# Altium PCB PCB.PcbDoc (part 2 of 2)
Units mil, origin at the board's own origin, x right, y up, seen from the top; angles counter-clockwise.
Board outline 9739 x 8533 mil, 4 copper layers (TopLayer, GND, VCC, BottomLayer); 78 components, 50 nets, 272 pads, 89 vias.
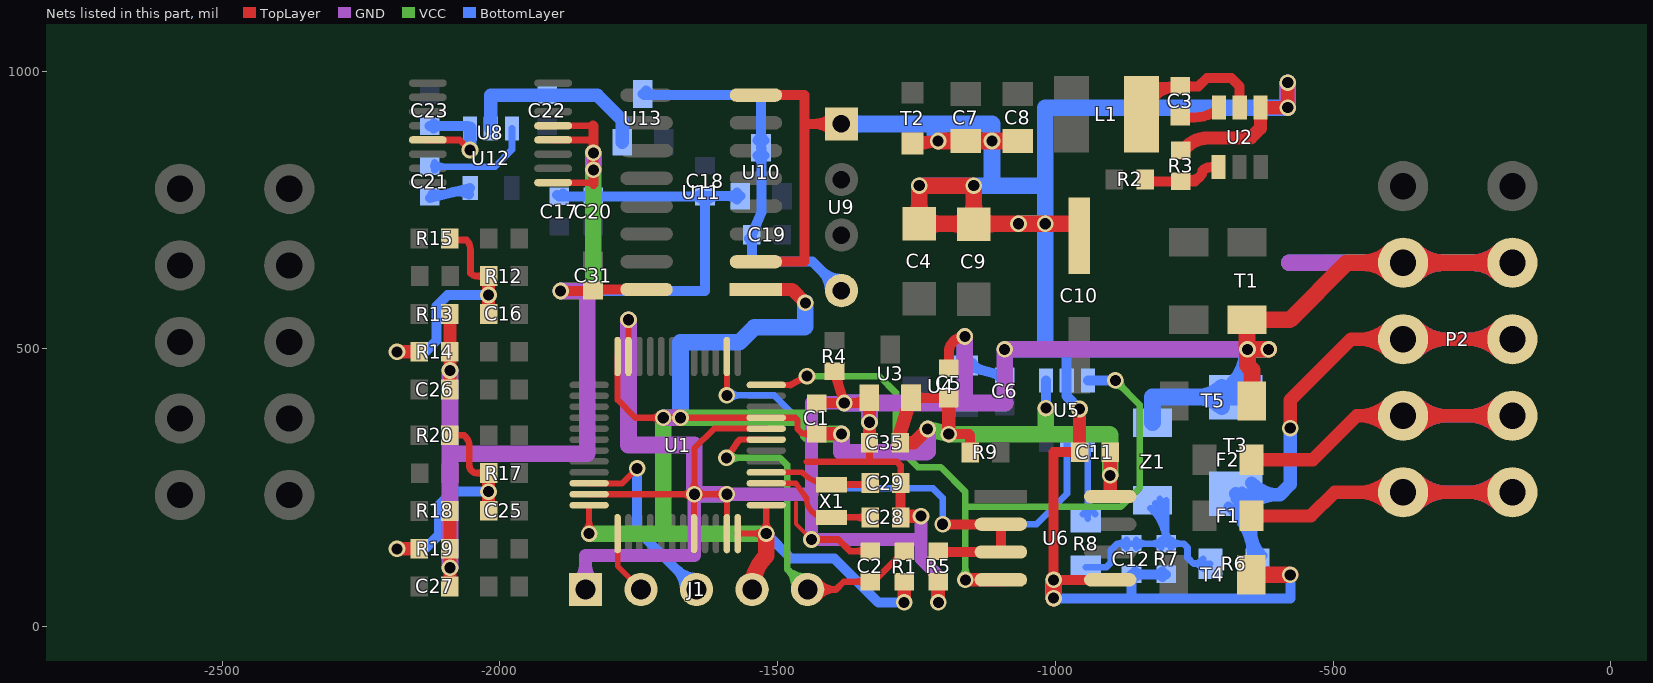
[diagram p4: the nets of this part, all layers, seen from the top]

## Via types
v1: diameter 30, hole 20, TopLayer to BottomLayer, 87 vias
v2: diameter 24, hole 12, TopLayer to BottomLayer, 2 vias

## Nets (pads, with @x,y where several pads share a name; then routed paths per layer and width w, separated by ;. In a path a pad name is that pad's centre, name@x,y a point inside that pad or via, vN(x,y) a via of type N, cw(c..) or ccw(c..) an arc to the next point about the centre after c; other vN are vias at no path point) (continued)
CPU_TXD: U1.12 U5.3 U6.4 | length 1451.7
  TopLayer w11: U1.12@-1520.51,435.14 -1476.96,435.14
  TopLayer w12: -1476.96,435.14 v1(-1446.96,450.87)
  TopLayer w24: v1(-1161.96,84.27) U6.4@-1097.96,84.27
  VCC w12: v1(-1446.96,450.87) -1316.96,450.87 -1286.96,420.87 -1286.96,326.68 -1247.16,286.87 -1206.16,286.87 -1161.96,242.68 -1161.96,215.87 ; v1(-1161.96,84.27) -1161.96,215.87 ; v1(-891.96,443.27) -847.96,399.27 -847.96,249.87 -881.96,215.87 -1161.96,215.87 ; -1161.96,106 cw(c-1183.69,106) -1168.32,90.64 ccw(c-1183.69,106) -1161.96,106 ; -1161.96,106 ccw(c-1140.23,106) -1155.6,90.64 cw(c-1140.23,106) -1161.96,106 ; -876.6,427.91 cw(c-861.23,443.27) -882.96,443.27 ccw(c-861.23,443.27) -876.6,427.91 ; -876.6,427.91 ccw(c-891.96,412.55) -891.96,434.27 cw(c-891.96,412.55) -876.6,427.91
  BottomLayer w18: U5.3@-941.16,443.27 v1(-891.96,443.27)
CPU_TXDEN: R5.2 U1.14 U5.5 U6.2 U6.3 | length 1412.1
  TopLayer w11: v1(-1591.38,416.46) U1.14@-1591.38,486.32
  TopLayer w18: R5.2@-1210.67,134.27 U6.3@-1097.96,134.27 U6.2@-1097.96,184.27 v1(-1202.96,184.27) ; R5.2@-1203.93,140.66 ccw(c-1188.5,156.09) -1188.5,134.27 cw(c-1188.5,156.09) R5.2@-1203.93,140.66
  BottomLayer w12: v1(-1591.38,416.46) -1506.54,416.46 -1444.96,354.87 -1444.96,273.87 -1419.96,248.87 -1219.96,248.87 -1202.96,231.87 v1(-1202.96,184.27) -1033.96,184.27 -978.96,239.27 U5.5@-978.96,336.27 ; -1569.65,416.46 cw(c-1569.65,438.18) -1585.01,422.82 ccw(c-1569.65,438.18) -1569.65,416.46 ; -1569.65,416.46 ccw(c-1569.65,394.73) -1585.01,410.09 cw(c-1569.65,394.73) -1569.65,416.46 ; -1181.23,184.27 cw(c-1181.23,206) -1196.6,190.64 ccw(c-1181.23,206) -1181.23,184.27 ; -1181.23,184.27 ccw(c-1181.23,162.55) -1196.6,177.91 cw(c-1181.23,162.55) -1181.23,184.27
DVDD: C1.1 C5.1 C11.2 C35.1 J1.4 R1.2 R9.2 U1.1 U1.9 U1.24 U1.36 U1.48 U3.2 U5.1 U6.8 U11.1 | length 4234.6
  TopLayer w11: v1(-1839.41,167.42) U1.36@-1839.41,218.6 ; U1.24@-1788.23,486.32 -1788.23,408.14 -1756.17,376.09 U1.9@-1520.51,376.09 -1468.17,376.09 -1463.96,371.87 -1463.96,355.75 -1455.58,347.38 ; U1.48@-1571.69,167.42 v1(-1520.51,167.42) ; v1@-1520.51,169.97 U1.1@-1520.51,218.6 ; C1.1@-1429.67,347.38 -1455.58,347.38 ; -1839.41,190.36 cw(c-1862.34,190.36) -1846.13,174.14 ccw(c-1862.34,190.36) -1839.41,190.36 ; -1839.41,190.36 ccw(c-1816.47,190.36) -1832.69,174.14 cw(c-1816.47,190.36) -1839.41,190.36 ; -1728.89,376.08 cw(c-1728.89,353.15) -1712.68,369.37 ccw(c-1728.89,353.15) -1728.89,376.08 ; -1728.89,376.09 ccw(c-1728.89,399.02) -1712.68,382.8 cw(c-1728.89,399.02) -1728.89,376.09 ; -1543.45,167.42 cw(c-1543.45,144.49) -1527.23,160.71 ccw(c-1543.45,144.49) -1543.45,167.42 ; -1543.45,167.42 ccw(c-1543.45,190.36) v1@-1527.23,174.14 ; -1543.45,167.42 ccw(c-1543.45,190.36) v1@-1527.23,174.14 ; v1@-1527.23,174.14 ccw(c-1543.45,190.36) -1520.51,190.36 ; v1@-1527.23,174.14 ccw(c-1543.45,190.36) -1520.51,190.36 ; -1520.51,190.36 ccw(c-1497.58,190.36) -1513.79,174.14 cw(c-1497.58,190.36) -1520.51,190.36 ; -1455.58,347.38 cw(c-1455.58,324.53) -1439.06,340.3 ccw(c-1455.58,324.53) -1455.58,347.38 ; -1455.58,347.38 ccw(c-1455.58,370.22) -1439.06,354.45 cw(c-1455.58,370.22) -1455.58,347.38
  TopLayer w18: U3.2@-1259.96,411.87 C5.1@-1198.77,411.87 ; v1(-1191.96,346.56) -1154.96,346.56 -1153.58,345.18 R9.2@-1153.58,313.56 ; U6.8@-901.34,234.51 U6.8@-901.11,234.27 ; -1238.92,411.87 cw(c-1238.92,432.92) -1253.8,418.04 ccw(c-1238.92,432.92) -1238.92,411.87 ; -1238.92,411.87 ccw(c-1238.92,390.83) -1253.8,405.71 cw(c-1238.92,390.83) -1238.92,411.87 ; -1153.58,331.82 cw(c-1169.86,331.82) -1158.35,320.3 ccw(c-1169.86,331.82) -1153.58,331.82 ; -1153.58,331.83 ccw(c-1137.28,331.83) -1148.8,320.3 cw(c-1137.28,331.83) -1153.58,331.83 ; -1213.59,411.87 cw(c-1213.59,390.41) -1198.41,405.59 ccw(c-1213.59,390.41) -1213.59,411.87
  TopLayer w24: U11.1@-1539,607 -1474,607 v1(-1450,583) ; C1.1@-1429.67,347.38 v1@-1385.46,347.38 ; C35.1@-1279.46,331.16 -1254.67,331.16 v1(-1229.96,355.87) ; C35.1@-1279.46,348.16 U3.2@-1259.96,411.87 ; v1(-1272.25,43.56) R1.2@-1272.25,80.66 ; v1(-1191.96,346.56) C5.1@-1191.96,410.85 ; U6.8@-901.34,234.51 C11.2@-901.34,313.98 ; U3.2@-1266.87,389.29 cw(c-1248.03,383.52) -1257.28,400.92 ccw(c-1248.03,383.52) U3.2@-1266.87,389.29
  TopLayer w30: J1.4@-1545.96,66.87 cw(c-1461.46,66.87) -1521.21,126.62 -1520.51,127.32 v1(-1520.51,167.42)
  GND w30: v1(-1705.96,376.09) v1(-1674.96,376.09) ; v1(-1384.96,346.87) -1384.96,313.87 -1231.27,313.87 -1229.96,315.18 v1(-1229.96,355.87)
  VCC w24: -902.25,346.56 -901.34,345.66
  VCC w30: v1(-1839.41,167.42) v1(-1520.51,167.42) ; -1705.96,168.42 v1(-1705.96,376.09) v1(-1674.96,376.09) -1445.96,376.09 -1445.96,347.38 -1445.96,346.87 v1(-1384.96,346.87) ; v1(-1229.96,355.87) v1(-1191.96,346.56) -902.25,346.56 ; -1016.96,351.56 v1(-1016.96,393.27) ; v1(-901.34,272.27) -901.34,345.66
  BottomLayer w18: v1(-1520.51,167.42) -1475.96,122.87 -1397.96,122.87 -1318.65,43.56 v1(-1272.25,43.56) ; v1(-1016.96,393.27) U5.1@-1016.96,443.27
  BottomLayer w30: v1(-1705.96,376.09) v1(-1674.96,376.09) -1674.96,512 -1569,512 -1542,539 -1451,539 -1450,540 v1(-1450,583)
GNDX: C1.2 C2.2 C4.2 C5.2 C6.2 C7.2 C8.2 C9.2 C10.2 C11.1 C12.2 C28.1 C29.1 C35.2 J1.1 P2.2 R3.1 R4.1 R5.1 R7.1 T1.2 T2.2 T3.2 T4.2 T5.2 U1.8 U1.23 U1.35 U1.44 U1.47 U2.4 U3.1 U4.1 U5.2 U6.5 U9.1 U11.2 U11.8 Z1.1 | length 15631
  TopLayer w8: -1466.96,222.87 -1466.96,184.87 v1(-1438.96,156.87)
  TopLayer w11: U1.35@-1839.41,238.29 -1591.79,238.29 v1@-1591.38,237.87 ; U1.23@-1768.54,486.32 v1(-1768.54,552.46) ; U1.44@-1650.43,167.42 v1@-1650.43,238.29 ; v1(-1649.96,238.29) -1649.96,320.87 -1614.43,356.4 U1.8@-1520.51,356.4 ; U1.47@-1591.38,167.42 v1(-1591.38,238.29) ; -1672.89,238.29 cw(c-1672.89,215.35) -1656.68,231.57 ccw(c-1672.89,215.35) -1672.89,238.29 ; -1672.89,238.29 ccw(c-1672.89,261.22) v1@-1656.68,245.01 ; -1672.89,238.29 ccw(c-1672.89,261.22) v1@-1656.68,245.01 ; v1@-1656.68,245.01 ccw(c-1672.89,261.22) -1649.96,261.22 ; v1@-1656.68,245.01 ccw(c-1672.89,261.22) -1649.96,261.22 ; -1649.96,261.22 ccw(c-1627.02,261.22) v1@-1643.24,245.01 ; -1649.96,261.22 ccw(c-1627.02,261.22) v1@-1643.24,245.01 ; v1@-1643.24,245.01 ccw(c-1627.02,261.22) -1627.02,238.29 ; v1@-1643.24,245.01 ccw(c-1627.02,261.22) -1627.02,238.29 ; -1627.02,238.29 ccw(c-1627.02,215.35) -1643.24,231.57 cw(c-1627.02,215.35) -1627.02,238.29 ; -1614.31,238.29 cw(c-1614.31,215.35) -1598.09,231.57 ccw(c-1614.31,215.35) -1614.31,238.29 ; -1614.31,238.29 ccw(c-1614.31,261.22) -1598.09,245.01 cw(c-1614.31,261.22) -1614.31,238.29
  TopLayer w12: -1446.96,296.87 -1284.96,296.87 -1278.46,290.38 C29.1@-1278.46,258.56 ; v1(-1438.96,156.87) -1390.96,156.87 -1369.98,135.9 C2.2@-1333.09,135.9 ccw(c-1333.09,136.99) C2.2@-1332,136.99 ; -1334.58,297.26 C35.2@-1334.58,331.16 ; -1358.59,135.9 cw(c-1358.59,112.36) -1341.95,129 ccw(c-1358.59,112.36) -1358.59,135.9 ; -1358.59,135.9 ccw(c-1358.59,159.43) -1341.95,142.79 cw(c-1358.59,159.43) -1358.59,135.9
  TopLayer w18: U11.2@-1539,657 -1452,657 -1452,957 U11.8@-1539,957 ; -1452,905 U9.1@-1385,905 ; C1.2@-1429.67,402.49 U3.1@-1334.58,402.49 ; R4.1@-1397.67,459.38 v1(-1379.96,402.49) ; C28.1@-1278.46,190.52 C28.1@-1278.46,196.56 -1278.46,228.87 C29.1@-1278.46,258.56 ; C5.2@-1191.67,465.47 -1191.67,493.56 ; C11.1@-956.46,313.98 -1003.25,313.98 -1003.25,85.56 -1001.96,84.27 -977.96,84.27 U6.5@-901.11,84.27 ; -1435.7,905 cw(c-1435.7,854.3) -1399.85,890.15 ccw(c-1435.7,854.3) -1435.7,905 ; -1435.7,905 ccw(c-1435.7,955.7) -1399.85,919.85 cw(c-1435.7,955.7) -1435.7,905 ; -1411.41,402.49 cw(c-1411.41,418.78) -1422.93,407.26 ccw(c-1411.41,418.78) -1411.41,402.49 ; -1411.41,402.49 ccw(c-1411.41,386.2) -1422.93,397.72 cw(c-1411.41,386.2) -1411.41,402.49 ; -1278.46,214.83 cw(c-1294.76,214.83) -1283.24,203.3 ccw(c-1294.76,214.83) -1278.46,214.83 ; -1278.46,214.82 ccw(c-1262.18,214.82) -1273.69,203.3 cw(c-1262.18,214.82) -1278.46,214.82 ; -1191.67,481.76 cw(c-1207.96,481.76) -1196.44,470.24 ccw(c-1207.96,481.76) -1191.67,481.76 ; -1191.67,481.76 ccw(c-1175.38,481.76) -1186.9,470.24 cw(c-1175.38,481.76) -1191.67,481.76 ; -1191.67,493.56 cw(c-1162.96,493.56) v1(-1162.96,522.27) ; -1191.67,493.56 cw(c-1162.96,493.56) v1(-1162.96,522.27) ; -1191.67,493.56 cw(c-1162.96,493.56) v1(-1162.96,522.27) ; -972.75,313.98 cw(c-972.75,297.69) -961.23,309.21 ccw(c-972.75,297.69) -972.75,313.98 ; -972.75,313.98 ccw(c-972.75,330.28) -961.23,318.76 cw(c-972.75,330.28) -972.75,313.98 ; -1391.31,438.94 cw(c-1369.63,445.68) -1389.73,456.24 ccw(c-1369.63,445.68) -1391.31,438.94 ; -1364.4,402.49 ccw(c-1364.4,435.41) -1341.12,412.13 cw(c-1364.4,435.41) -1364.4,402.49 ; C29.1@-1283.24,251.82 cw(c-1294.76,240.3) -1278.46,240.3 ccw(c-1294.76,240.3) C29.1@-1283.24,251.82 ; -1278.46,240.31 cw(c-1262.18,240.31) -1273.69,251.82 ccw(c-1262.18,240.31) -1278.46,240.31 ; -1003.25,99.46 ccw(c-987.77,99.46) -998.72,88.52 cw(c-987.77,99.46) -1003.25,99.46
  TopLayer w24: C35.2@-1334.58,334.16 U3.1@-1334.58,411.49 ; C28.1@-1278.46,198.87 v1(-1241.96,198.87) ; T2.2@-1257,868.76 v1(-1210.96,874.23) ; v1(-1210.67,43.56) R5.1@-1210.67,80.78 ; C11.1@-956.46,313.98 v1(-956.46,391.78) ; R3.1@-774.25,853.37 -763.86,863.76 cw(c-724.96,824.86) -724.96,879.87 -647.91,879.87 -630.69,897.09 U2.4@-630.69,934.49 ; U2.4@-630.96,934.49 U2.4@-630.69,934.49 ; v1(-581.51,979.49) v1(-581.51,934.49) ; v1@-581,935 v1(-581.51,934.49) ; U2.4@-630.69,934.49 v1(-581.51,934.49) ; T2.2@-1252.24,875.8 ccw(c-1238.66,893.04) -1236.08,871.25 cw(c-1238.66,893.04) T2.2@-1252.24,875.8
  TopLayer w30: v1(-1245,794) v1@-1244.96,793.96 ; v1(-1210.96,874.23) C7.2@-1160.96,874.23 C8.2@-1067.96,874.23 ; C9.2@-1146.96,724.27 v1(-1146.96,794.04) -1147.04,793.96 v1@-1244.96,793.96 ; v1(-1002.96,51.27) v1(-1002.96,84.27) ; C10.2@-959.96,725.27 C4.2@-1244.96,725.27 v1@-1244.96,793.96 ; v1@-654.96,500.27 T1.2@-654.96,552.27 -577.73,552.27 -474.8,655.2 P2.2@-177,655.2 ; T4.2@-646.96,93.27 v1(-576.96,93.27) ; T5.2@-645.96,406.27 -645.96,462.27 -653.96,470.27 v1(-653.96,499.27) v1(-615.96,499.27) ; -1244.96,761.49 cw(c-1281.17,761.49) -1255.57,735.88 ccw(c-1281.17,761.49) -1244.96,761.49 ; -1244.96,761.49 ccw(c-1208.75,761.49) C4.2@-1234.35,735.88 ; -1244.96,761.49 ccw(c-1208.75,761.49) C4.2@-1234.35,735.88 ; C4.2@-1234.35,735.88 ccw(c-1208.75,761.49) -1208.75,725.27 ; C4.2@-1234.35,735.88 ccw(c-1208.75,761.49) -1208.75,725.27 ; -1208.75,725.27 ccw(c-1208.75,689.06) -1234.35,714.67 cw(c-1208.75,689.06) -1208.75,725.27 ; C9.2@-1157.57,734.88 cw(c-1180.76,758.07) -1180.76,725.27 ccw(c-1180.76,758.07) C9.2@-1157.57,734.88 ; C9.2@-1157.57,734.88 ccw(c-1183.17,760.49) -1146.96,760.49 ; C9.2@-1157.57,734.88 ccw(c-1183.17,760.49) -1146.96,760.49 ; -1146.96,760.49 ccw(c-1110.75,760.49) C9.2@-1136.35,734.88 ; -1146.96,760.49 ccw(c-1110.75,760.49) C9.2@-1136.35,734.88 ; C9.2@-1136.35,734.88 ccw(c-1113.16,758.07) -1113.16,725.27 cw(c-1113.16,758.07) C9.2@-1136.35,734.88 ; -446.94,655.2 cw(c-446.94,582.11) -395.26,633.8 ccw(c-446.94,582.11) -446.94,655.2 ; -446.94,655.2 ccw(c-446.94,728.3) -395.26,676.61 cw(c-446.94,728.3) -446.94,655.2 ; -300.76,655.2 cw(c-300.76,728.3) -352.44,676.61 ccw(c-300.76,728.3) -300.76,655.2 ; -300.76,655.2 ccw(c-300.76,582.11) -352.44,633.8 cw(c-300.76,582.11) -300.76,655.2 ; -250.09,655.2 cw(c-250.09,582.11) -198.41,633.8 ccw(c-250.09,582.11) -250.09,655.2 ; -250.09,655.2 ccw(c-250.09,728.3) -198.41,676.61 cw(c-250.09,728.3) -250.09,655.2 ; -1185.59,725.27 cw(c-1185.59,685.65) -1157.57,713.67 ccw(c-1185.59,685.65) -1185.59,725.27 ; C9.2@-1136.35,713.67 cw(c-1108.33,685.65) -1108.33,725.27 ccw(c-1108.33,685.65) C9.2@-1136.35,713.67
  GND w24: J1.1@-1845.96,66.87 -1845.96,127.96 -1846,128 -1650,128 -1649.96,128.04 v1(-1649.96,238.29) ; v1(-1591.38,238.29) -1438.38,238.29 ; v1(-1379.96,402.49) -1380.47,403 -1439,403 -1438.96,402.96 v1(-1438.96,156.87) -1241.96,156.87 ; v1(-1241.96,198.87) -1241.96,122.87 -1210.67,91.58 v1(-1210.67,43.56) ; -1845.96,110.33 cw(c-1889.42,110.33) -1858.69,79.6 ccw(c-1889.42,110.33) -1845.96,110.33 ; -1845.96,110.33 ccw(c-1802.5,110.33) -1833.23,79.6 cw(c-1802.5,110.33) -1845.96,110.33
  GND w30: J1.1@-1846.96,67.87 J1.1@-1845.96,66.87 ; v1(-1768.54,552.46) -1768.54,327.46 -1768.35,327 -1650.09,327 -1649.96,326.87 v1(-1649.96,238.29) v1(-1591.38,238.29) ; v1(-1379.96,402.49) -1090.58,402.49 ; v1(-1334.58,367.87) -1333.96,368.49 -1333.96,402.49 ; -1162.96,407.49 v1(-1162.96,522.27) ; -1091.25,403.16 v1(-1091.25,499.27) v1(-615.96,499.27) ; v1(-1066.16,725.27) v1(-1018.16,725.27) ; v1(-1002.96,51.27) v1(-1002.96,84.27) ; v1(-581.51,934.49) v1(-581.51,979.49) ; -578.52,655.2 P2.2@-177,655.2
  VCC w30: v1(-1649.96,238.29) v1(-1591.38,238.29) ; v1(-1066.16,725.27) v1(-1018.16,725.27) ; v1(-1002.96,51.27) v1(-1002.96,84.27) ; v1(-653.96,499.27) v1(-615.96,499.27) ; v1(-581.51,934.49) v1(-581.51,979.49) ; -515,655.2 P2.2@-177,655.2
  BottomLayer w18: U4.1@-1162.96,470.27 C6.2@-1091.25,450.89 ; v1(-1002.96,84.27) v1(-1002.96,51.27) -1001.96,50.27 -873.96,50.27 ; -979.67,499.27 -979.67,443.39 U5.2@-979.56,443.27 -979.56,414.88 v1(-956.46,391.78) ; R7.1@-800.66,94.16 C12.2@-862.96,94.16 -862.96,50.27 -873.96,50.27 ; v1(-576.96,93.27) -576.36,92.68 -576.36,50.27 -873.96,50.27 ; -862.96,77.87 cw(c-846.67,77.87) -858.19,89.39 ccw(c-846.67,77.87) -862.96,77.87 ; -862.96,77.87 ccw(c-879.25,77.87) -867.73,89.39 cw(c-879.25,77.87) -862.96,77.87 ; -844.7,94.16 cw(c-844.7,110.45) -856.22,98.93 ccw(c-844.7,110.45) -844.7,94.16 ; -844.7,94.16 ccw(c-844.7,77.87) -856.22,89.39 cw(c-844.7,77.87) -844.7,94.16 ; U4.1@-1149.5,474.62 ccw(c-1126.69,487.72) -1133.55,462.32 cw(c-1126.69,487.72) U4.1@-1149.5,474.62 ; -1110.01,455.96 cw(c-1114.72,438.54) -1099.07,447.53 ccw(c-1114.72,438.54) -1110.01,455.96 ; v1@-998.72,55.52 ccw(c-986.06,68.17) -986.06,50.27 cw(c-986.06,68.17) v1@-998.72,55.52 ; -819.09,94.16 ccw(c-819.09,110.86) -807.28,99.05 cw(c-819.09,110.86) -819.09,94.16 ; -818.51,94.16 cw(c-818.51,78.28) -807.28,89.51 ccw(c-818.51,78.28) -818.51,94.16 ; v1@-581.2,89.03 cw(c-592.89,77.34) -576.36,77.34 ccw(c-592.89,77.34) v1@-581.2,89.03
  BottomLayer w24: C6.2@-1091.25,450.89 v1(-1091.25,499.27)
  BottomLayer w30: v1(-1649.96,238.29) v1(-1591.38,238.29) ; U9.1@-1385,905 -1114,905 -1113.96,904.96 v1(-1113.96,874.23) -1113.96,795.04 -1115,794 ; v1(-1379.96,402.49) -1335.19,402.49 -1334.58,401.87 v1(-1334.58,367.87) ; v1(-1245,794) -1019,794 -1018.16,793.16 -1018.16,774 ; U4.1@-1162.96,470.27 v1(-1162.96,522.27) ; v1(-1091.25,499.27) v1(-615.96,499.27) ; v1(-1066.16,725.27) v1(-1018.16,725.27) ; -1018.16,501.27 v1(-1018.16,725.27) ; v1(-1002.96,51.27) v1(-1002.96,84.27) ; Z1.1@-824.96,367.27 -824.96,413.27 T3.2@-674.96,413.27 ; T3.2@-653.96,434.27 v1(-653.96,499.27) ; v1(-581.51,979.49) v1(-581.51,934.49) -1018.16,934.49 -1018.16,774 ; -578.52,655.2 P2.2@-177,655.2 P2.2@-373.85,655.2 ; P2.2@-352.44,633.8 cw(c-300.76,582.11) -300.76,655.2 cw(c-300.76,728.3) P2.2@-352.44,676.61 ; P2.2@-198.41,633.8 ccw(c-250.09,582.11) -250.09,655.2 ccw(c-250.09,728.3) P2.2@-198.41,676.61 ; -1348.79,905 cw(c-1348.79,941.21) -1374.39,915.61 ccw(c-1348.79,941.21) -1348.79,905 ; -1348.79,905 ccw(c-1348.79,868.79) -1374.39,894.39 cw(c-1348.79,868.79) -1348.79,905 ; v1(-1210.96,874.23) cw(c-1194.1,889.1) -1210,905 ; v1(-1210.96,874.23) cw(c-1194.1,889.1) -1210,905 ; v1(-1210.96,874.23) -1210.96,904.04 -1210,905 ; v1(-1018.16,725.27) -1018.16,774 ; -743.31,413.27 cw(c-743.31,352.92) -700.64,395.6 ccw(c-743.31,352.92) -743.31,413.27 ; -743.31,413.27 ccw(c-743.31,473.63) -700.64,430.95 cw(c-743.31,473.63) -743.31,413.27 ; v1(-653.96,499.27) cw(c-745.26,499.27) -683.79,431.76 ccw(c-745.26,499.27) v1(-653.96,499.27)
ISO+2V0: C22.2 U12.2 U13.2 | length 354.4
  BottomLayer w24: U12.2@-2016.6,897 -2016.6,956.38 ; -2016.54,956.41 -1824.41,956.41 -1780,912 U13.2@-1780,872
ISO+3V3: C17.1 C18.2 C20.1 C26.2 C27.2 C31.2 R13.1 R14.1 R18.1 R19.1 U8.9 U8.12 U8.13 U10.2 U11.16 | length 3295.8
  TopLayer w12: U8.9@-1904.17,799.43 -1834.14,799.43 -1831.71,797 ; U8.12@-1904.17,876.2 -1833.91,876.2 -1831.71,874 ; U8.13@-1904.17,901.79 -1832.21,901.79 -1832,902
  TopLayer w18: C27.2@-2089.95,72.3 C27.2@-2089.89,72.24 ; C26.2@-2089.89,426.79 C26.2@-2089.89,426.79 ; v1(-1890.62,604.38) C31.2@-1832.29,604.38 -1829.67,607 U11.16@-1736,607 ; -1832,902 -1831.71,901.71 v1(-1831.71,822.29) -1831.71,797 ; -1850.55,604.38 cw(c-1850.55,588.09) -1839.03,599.61 ccw(c-1850.55,588.09) -1850.55,604.38 ; -1850.55,604.38 ccw(c-1850.55,620.67) -1839.03,609.15 cw(c-1850.55,620.67) -1850.55,604.38 ; C31.2@-1825.55,599.61 cw(c-1807.71,581.77) -1807.71,607 ccw(c-1807.71,581.77) C31.2@-1825.55,599.61
  TopLayer w24: C27.2@-2089.95,72.3 R18.1@-2089.95,208.16 ; C26.2@-2089.89,426.79 R13.1@-2089.95,562.71
  GND w30: v1(-2089.95,106) -2089.95,311 ; v1(-2089.95,461) -2089.95,311 ; v1(-1890.62,604.38) -1843,604.38 -1843,311 -2089.95,311 ; v1(-1831.71,822.29) v1(-1831.71,853)
  VCC w30: v1(-1890.62,604.38) -1833,604.38 -1831.71,605.67 v1(-1831.71,853)
  BottomLayer w18: C17.1@-1896.83,777.5 -1893.72,774.38 C18.2@-1630.71,774.38 ; v1(-1890.62,604.38) -1630.71,604.38 C18.2@-1630.71,774.38 ; C20.1@-1831.71,774.88 v1(-1831.71,822.29) ; U10.2@-1567,775 -1630.09,775 C18.2@-1630.71,774.38 ; -1831.71,791.17 cw(c-1848,791.17) -1836.48,779.65 ccw(c-1848,791.17) -1831.71,791.17 ; -1831.71,791.17 ccw(c-1815.42,791.17) -1826.94,779.65 cw(c-1815.42,791.17) -1831.71,791.17 ; -1648.97,774.38 cw(c-1648.97,758.09) -1637.45,769.61 ccw(c-1648.97,758.09) -1648.97,774.38 ; -1648.97,774.38 ccw(c-1648.97,790.67) -1637.45,779.15 cw(c-1648.97,790.67) -1648.97,774.38 ; -1630.71,758.09 cw(c-1614.42,758.09) -1625.94,769.61 ccw(c-1614.42,758.09) -1630.71,758.09 ; -1630.71,758.09 ccw(c-1647,758.09) -1635.48,769.61 cw(c-1647,758.09) -1630.71,758.09 ; -1588.04,775 cw(c-1588.04,753.96) -1573.16,768.84 ccw(c-1588.04,753.96) -1588.04,775 ; -1588.04,775 ccw(c-1588.04,796.04) -1573.16,781.16 cw(c-1588.04,796.04) -1588.04,775 ; C17.1@-1886.69,779.65 ccw(c-1873.97,792.37) -1873.97,774.38 cw(c-1873.97,792.37) C17.1@-1886.69,779.65 ; -1851.17,774.38 ccw(c-1851.17,792.37) -1838.45,779.65 cw(c-1851.17,792.37) -1851.17,774.38 ; C20.1@-1824.97,779.65 ccw(c-1812.25,792.37) -1812.25,774.38 cw(c-1812.25,792.37) C20.1@-1824.97,779.65 ; C18.2@-1623.97,769.61 cw(c-1610.96,756.6) -1610.96,775 ccw(c-1610.96,756.6) C18.2@-1623.97,769.61
  BottomLayer w30: v1(-1831.71,822.29) v1(-1831.71,853)
ISO+3V6: C19.1 U9.4 U10.3 U13.3 | length 1064.1
  BottomLayer w18: U13.3@-1743,959 -1741,957 -1530,957 U10.3@-1530,862 -1529,861 -1529,746 C19.1@-1546.5,705.29 -1546,704.79 -1546,657 -1437,657 U9.4@-1385,605 ; -1530,890.33 cw(c-1551.04,890.33) -1536.16,875.45 ccw(c-1551.04,890.33) -1530,890.33 ; -1530,890.33 ccw(c-1508.96,890.33) -1523.84,875.45 cw(c-1508.96,890.33) -1530,890.33 ; -1420.85,640.85 cw(c-1456.7,605) -1406,605 ccw(c-1456.7,605) -1420.85,640.85 ; -1420.85,640.85 ccw(c-1385,676.7) -1385,626 cw(c-1385,676.7) -1420.85,640.85 ; U13.3@-1736.84,965.16 ccw(c-1717.13,984.87) -1717.13,957 cw(c-1717.13,984.87) U13.3@-1736.84,965.16 ; C19.1@-1551.27,698.55 cw(c-1564,685.82) -1546,685.82 ccw(c-1564,685.82) C19.1@-1551.27,698.55 ; U10.3@-1536.16,848.55 cw(c-1553.46,831.26) -1529,831.26 ccw(c-1553.46,831.26) U10.3@-1536.16,848.55 ; -1529,836.09 cw(c-1511.37,836.09) -1523.84,848.55 ccw(c-1511.37,836.09) -1529,836.09
ISO-2V0: C23.2 U8.5 U12.1 | length 247.7
  TopLayer w12: U8.5@-2129.82,876.2 -2072.2,876.2 v1(-2054,858)
  BottomLayer w18: C23.2@-2126.46,901.18 -2058.18,901.18 U12.1@-2054,897 ; -2108.2,901.18 cw(c-2108.2,917.47) -2119.72,905.95 ccw(c-2108.2,917.47) -2108.2,901.18 ; -2108.2,901.18 ccw(c-2108.2,884.89) -2119.72,896.41 cw(c-2108.2,884.89) -2108.2,901.18
  BottomLayer w24: v1(-2054,858) U12.1@-2054,897
NetC3_1: C3.1 L1.1 U2.5 | length 517.6
  TopLayer w18: L1.1@-864.17,971.77 C3.1@-779.25,971.77 ; C3.1@-758.16,972.87 -742.15,972.87 -727.16,987.87 -683.16,987.87 -667.96,972.68 U2.5@-667.96,934.27 ; -753.24,972.87 -776.59,972.87 ccw(c-776.59,969.11) C3.1@-779.25,971.77 ; C3.1@-779.25,971.77 ccw(c-779.25,913.75) -826.61,947.28 cw(c-779.25,913.75) C3.1@-779.25,971.77 ; C3.1@-768.14,978.14 ccw(c-755.42,990.86) -755.42,972.87 ; C3.1@-768.14,978.14 ccw(c-755.42,990.86) -755.42,972.87 ; C3.1@-768.14,978.14 ccw(c-755.42,990.86) -755.42,972.87 ; C3.1@-768.14,978.14 ccw(c-755.42,990.86) -755.42,972.87 ; L1.1@-841.3,957.68 cw(c-814.05,938.38) -814.05,971.77 ccw(c-814.05,938.38) L1.1@-841.3,957.68 ; -797,971.77 ccw(c-797,993.53) -781.62,978.14 cw(c-797,993.53) -797,971.77
NetC3_2: C3.2 U2.6 | length 126.3
  TopLayer w18: C3.2@-779.25,916.66 -748.54,916.66 ; -748.54,916.66 ccw(c-748.54,977.53) U2.6@-705.49,934.49 cw(c-748.54,977.53) -748.54,916.66
NetC12_1: C12.1 R6.1 R7.2 R8.2 Z1.2 | length 1115.4
  BottomLayer w12: R8.2@-944.96,106.63 -908.61,106.63 -899.96,115.27 -899.96,137.69 -888.25,149.39 ; Z1.2@-800.54,227.27 R7.2@-800.54,149.39 ; R6.1@-720.96,113.27 -750.96,113.27 ; -888.25,149.39 cw(c-888.25,126.66) -871.93,142.49 ccw(c-888.25,126.66) -888.25,149.39 ; -888.25,149.39 R7.2@-800.54,149.39 ; -826.04,149.39 cw(c-826.04,125.86) -809.4,142.5 ccw(c-826.04,125.86) -826.04,149.39 ; -826.04,149.39 ccw(c-826.04,172.93) -809.4,156.29 cw(c-826.04,172.93) -826.04,149.39 ; R7.2@-800.54,149.39 -769.08,149.39 -761.96,142.27 -761.96,124.27 -750.96,113.27 ; -800.54,172.93 cw(c-824.07,172.93) -807.43,156.29 ccw(c-824.07,172.93) -800.54,172.93 ; -800.54,172.93 ccw(c-777.01,172.93) -793.65,156.29 cw(c-777.01,172.93) -800.54,172.93 ; -775.04,149.39 cw(c-775.04,172.93) -791.68,156.29 ccw(c-775.04,172.93) -775.04,149.39 ; -775.04,149.39 ccw(c-775.04,125.86) -791.68,142.5 cw(c-775.04,125.86) -775.04,149.39 ; -750.96,113.27 cw(c-750.96,92.36) -733.8,104.32 ccw(c-750.96,92.36) -750.96,113.27 ; -750.96,113.27 ccw(c-750.96,134.19) -733.8,122.23 cw(c-750.96,134.19) -750.96,113.27 ; -888.18,149.39 ccw(c-888.18,172.52) -871.82,156.17 cw(c-888.18,172.52) -888.18,149.39 ; C12.1@-854.1,142.38 cw(c-837.17,125.45) -837.17,149.39 ccw(c-837.17,125.45) C12.1@-854.1,142.38 ; C12.1@-854.1,156.17 ccw(c-837.75,172.52) -837.75,149.39 cw(c-837.75,172.52) C12.1@-854.1,156.17 ; Z1.2@-828.56,213.03 cw(c-889.89,148.05) -800.54,148.05 ccw(c-889.89,148.05) Z1.2@-828.56,213.03 ; Z1.2@-820.33,221.75 cw(c-863.63,175.87) -800.54,175.87 ccw(c-863.63,175.87) Z1.2@-820.33,221.75 ; Z1.2@-812.09,230.48 cw(c-837.37,203.7) -800.54,203.7 ccw(c-837.37,203.7) Z1.2@-812.09,230.48
NetC16_1: C16.1 R12.1 R14.2 R15.1 | length 540.1
  TopLayer w12: R15.1@-2089.95,698.93 ccw(c-2082.88,705.99) -2082.88,696 -2060,696 cw(c-2076.9,679.1) -2053,679.1 -2053,670.34 -2053,636 ccw(c-2041.21,647.79) -2041.21,631.11 ; R12.1@-2020.5,631.11 -2041.21,631.11 ; -2041.21,631.11 cw(c-2041.21,613.99) -2028.01,624.9 ccw(c-2041.21,613.99) -2041.21,631.11 ; -2041.21,631.11 ccw(c-2041.21,648.24) -2028.01,637.33 cw(c-2041.21,648.24) -2041.21,631.11
  TopLayer w18: R12.1@-2022.14,631.11 R12.1@-2020.5,631.11
  TopLayer w24: v1(-2185.23,494.6) R14.2@-2145.06,494.6 ; C16.1@-2020.5,563.01 R12.1@-2020.5,631.11
  BottomLayer w18: v1(-2185.23,494.6) -2134.4,494.6 -2114,515 -2114,577 -2094,597 v1(-2020.5,597)
NetC21_1: C21.1 U12.5 | length 170.2
  BottomLayer w18: C21.1@-2126.16,771.89 U12.5@-2053.54,789.79 U12.5@-2056.24,787.08 ; C21.1@-2121.12,779.36 ccw(c-2110.45,797.01) -2105.52,776.98 cw(c-2110.45,797.01) C21.1@-2121.12,779.36 ; -2084.49,782.16 cw(c-2075.48,745.61) -2056.01,777.82 ccw(c-2075.48,745.61) -2084.49,782.16
NetC21_2: C21.2 U12.3 | length 264.5
  BottomLayer w12: C21.2@-2116.1,828 -2009,828 -1978.2,858.8 U12.3@-1978.2,897 ; C21.2@-2117.72,821.8 cw(c-2102.75,806.84) -2102.75,828 ccw(c-2102.75,806.84) C21.2@-2117.72,821.8 ; C21.2@-2117.72,835.59 ccw(c-2099.4,853.91) -2099.4,828 cw(c-2099.4,853.91) C21.2@-2117.72,835.59
  BottomLayer w18: C21.2@-2117.29,829.19 C21.2@-2116.1,828
NetC25_1: C25.1 R17.1 R19.2 R20.1 | length 535.3
  TopLayer w12: R20.1@-2089.95,344.38 -2064.38,344.38 -2062.07,342.07 cw(c-2079.14,325) -2055,325 -2055,290 ccw(c-2041.57,290) -2041.57,276.57 ; R17.1@-2020.5,276.57 -2041.57,276.57 ; -2041.57,276.57 cw(c-2041.57,258.67) -2027.93,270.26 ccw(c-2041.57,258.67) -2041.57,276.57 ; -2041.57,276.57 ccw(c-2041.57,294.46) -2027.93,282.88 cw(c-2041.57,294.46) -2041.57,276.57
  TopLayer w18: R20.1@-2089.95,344.38 R20.1@-2088.31,344.38
  TopLayer w24: v1(-2185.23,140.05) R19.2@-2145.06,140.05 ; C25.1@-2020.5,208.46 R17.1@-2020.5,276.57
  BottomLayer w18: v1(-2185.23,140.05) -2134.95,140.05 -2110,165 -2110,218 -2085,243 v1(-2020.5,243)
NetC28_2: C28.2 U1.3 X1.2 | length 303.4
  TopLayer w10: U1.3@-1519.73,257.2 U1.3@-1520.51,257.97 -1467.49,257.97 -1465.3,255.78 -1447.96,230.87 ccw(c-1413.43,230.87) -1413.43,196.34 X1.2@-1402.96,196.34
  TopLayer w12: X1.2@-1410.96,196.74 C28.2@-1333.76,196.74 ; -1357.54,196.74 cw(c-1357.54,172.6) -1340.47,189.67 ccw(c-1357.54,172.6) -1357.54,196.74 ; -1356.68,196.74 ccw(c-1356.68,219.67) -1340.47,203.46 cw(c-1356.68,219.67) -1356.68,196.74
NetC29_2: C29.2 U1.4 X1.1 | length 202.1
  TopLayer w10: U1.4@-1520.51,277.66 -1455.96,277.66 -1455.44,277.14 ccw(c-1402.96,329.62) X1.1@-1402.96,255.4
  TopLayer w12: X1.1@-1410.96,255.81 -1336.34,255.81 C29.2@-1333.58,258.56
NetR2_1: R2.1 R3.2 U2.1 | length 308.7
  TopLayer w18: R2.1@-838.46,801.16 -748.84,801.16 -739.08,810.92 ; U2.1@-705.96,827.27 -719.5,827.27 ccw(c-719.5,805.42) -734.96,820.87 cw(c-749.04,820.87) -739.08,810.92 ; -739.08,810.92 cw(c-755.69,827.52) -768.57,807.9 ccw(c-755.69,827.52) -739.08,810.92 ; R2.1@-833.69,807.96 ccw(c-817.27,824.39) -817.27,801.16 cw(c-817.27,824.39) R2.1@-833.69,807.96 ; -795.15,801.16 ccw(c-795.15,821.19) -780.99,807.03 cw(c-795.15,821.19) -795.15,801.16 ; R3.2@-767.51,807.03 ccw(c-753.35,821.19) -753.35,801.16 cw(c-753.35,821.19) R3.2@-767.51,807.03
NetR8_1: R8.1 U5.4 | length 260.2
  BottomLayer w12: R8.1@-941.69,194.54 U5.4@-941.69,336.06 ; R8.1@-950.12,202.34 ccw(c-970.48,222.7) -941.69,222.7 cw(c-970.48,222.7) R8.1@-950.12,202.34 ; -941.69,235.43 ccw(c-894.9,235.43) -927.99,202.34 cw(c-894.9,235.43) -941.69,235.43
NRST: C2.1 J1.5 R1.1 U1.7 | length 1055.6
  TopLayer w11: -1567.96,336.71 U1.7@-1520.51,336.71
  TopLayer w12: v1(-1591.96,303.87) -1572.96,331.71 -1567.96,336.71 ; J1.5@-1445.96,66.87 -1394.96,66.87 ; R1.1@-1272.25,135.77 -1327.24,80.78 C2.1@-1333.09,80.78 -1381.05,80.78 -1394.96,66.87 ; -1394.96,66.87 cw(c-1394.96,109.06) -1427.47,82.17 ccw(c-1394.96,109.06) -1394.96,66.87 ; -1394.96,66.87 ccw(c-1394.96,24.69) -1427.47,51.58 cw(c-1394.96,24.69) -1394.96,66.87 ; -1358.6,80.78 cw(c-1358.6,57.25) -1341.95,73.89 ccw(c-1358.6,57.25) -1358.6,80.78 ; -1358.6,80.78 ccw(c-1358.6,104.32) -1341.95,87.68 cw(c-1358.6,104.32) -1358.6,80.78
  VCC w12: v1(-1591.96,303.87) -1495.96,303.87 -1482.96,290.87 -1482.96,103.87 ; v1@-1585.6,297.51 cw(c-1570.23,282.14) -1570.23,303.87 cw(c-1570.23,325.6) v1@-1585.6,310.24 ; J1.5@-1445.96,66.87 -1482.96,103.87 ; -1482.96,103.87 cw(c-1514.8,72.03) -1469.89,68.66 ccw(c-1514.8,72.03) -1482.96,103.87 ; -1482.96,103.87 ccw(c-1451.11,135.71) -1447.75,90.81 cw(c-1451.11,135.71) -1482.96,103.87
SDI12: P2.3 R6.2 T3.1 | length 2826.6
  TopLayer w24: v1(-576.96,357.27) -576.96,408.04 -467.59,517.41 P2.3@-177,517.41 ; -454.18,517.41 cw(c-454.18,437.08) -397.38,493.88 ccw(c-454.18,437.08) -454.18,517.41 ; -454.18,517.41 ccw(c-454.18,597.74) -397.38,540.94 cw(c-454.18,597.74) -454.18,517.41 ; -293.52,517.41 cw(c-293.52,597.74) -350.32,540.94 ccw(c-293.52,597.74) -293.52,517.41 ; -293.52,517.41 ccw(c-293.52,437.08) -350.32,493.88 cw(c-293.52,437.08) -293.52,517.41 ; -257.33,517.41 cw(c-257.33,437.08) -200.53,493.88 ccw(c-257.33,437.08) -257.33,517.41 ; -257.33,517.41 ccw(c-257.33,597.74) -200.53,540.94 cw(c-257.33,597.74) -257.33,517.41
  BottomLayer w18: T3.1@-670.96,235.27 T3.1@-674.96,239.27 -645.16,209.47 -645.16,122.12 R6.2@-636.31,113.27 ; T3.1@-687.78,216.31 cw(c-775.02,120.11) -645.16,120.11 ccw(c-775.02,120.11) T3.1@-687.78,216.31 ; T3.1@-675.69,229.64 cw(c-738.18,160.73) -645.16,160.73 ccw(c-738.18,160.73) T3.1@-675.69,229.64 ; T3.1@-663.6,242.98 cw(c-701.35,201.35) -645.16,201.35 ccw(c-701.35,201.35) T3.1@-663.6,242.98 ; -645.16,171.08 ccw(c-584.42,171.08) -627.37,128.13 cw(c-584.42,171.08) -645.16,171.08
  BottomLayer w24: T3.1@-674.96,239.27 -672.69,237 -595.96,237 ; v1(-576.96,357.27) -576.96,256 -595.96,237 ; P2.3@-373.85,517.41 P2.3@-177,517.41 ; P2.3@-350.32,493.88 cw(c-293.52,437.08) -293.52,517.41 cw(c-293.52,597.74) P2.3@-350.32,540.94 ; P2.3@-200.53,493.88 ccw(c-257.33,437.08) -257.33,517.41 ccw(c-257.33,597.74) P2.3@-200.53,540.94 ; -595.96,237 cw(c-595.96,307.39) -646.75,258.66 ccw(c-595.96,307.39) -595.96,237 ; T3.1@-647.16,219.47 cw(c-604.85,177.17) -604.85,237 ccw(c-604.85,177.17) T3.1@-647.16,219.47
SWCLK: J1.2 U1.37 | length 118.1
  TopLayer w10: U1.37@-1788.23,167.42 -1788.23,109.14 J1.2@-1745.96,66.87
SWDIO: J1.3 U1.34 | length 519.2
  TopLayer w11: U1.34@-1839.41,257.97 -1779.86,257.97 v1(-1752.96,284.87)
  BottomLayer w18: v1(-1752.96,284.87) -1752.96,173.87 J1.3@-1645.96,66.87 ; -1681.81,102.72 cw(c-1717.66,66.87) -1666.96,66.87 ccw(c-1717.66,66.87) -1681.81,102.72 ; -1681.81,102.72 ccw(c-1645.96,138.57) -1645.96,87.87 cw(c-1645.96,138.57) -1681.81,102.72
T+: F1.1 P2.5 | length 1767.2
  TopLayer w24: F1.1@-646.96,199.27 -539.73,199.27 -497.18,241.82 P2.5@-177,241.82 ; -623.65,199.27 cw(c-623.65,222.58) -640.13,206.1 ccw(c-623.65,222.58) -623.65,199.27 ; -623.65,199.27 ccw(c-623.65,175.97) -640.13,192.45 cw(c-623.65,175.97) -623.65,199.27 ; -454.18,241.82 cw(c-454.18,161.48) -397.38,218.29 ccw(c-454.18,161.48) -454.18,241.82 ; -454.18,241.82 ccw(c-454.18,322.15) -397.38,265.35 cw(c-454.18,322.15) -454.18,241.82 ; -293.52,241.82 cw(c-293.52,322.15) -350.32,265.35 ccw(c-293.52,322.15) -293.52,241.82 ; -293.52,241.82 ccw(c-293.52,161.48) -350.32,218.29 cw(c-293.52,161.48) -293.52,241.82 ; -257.33,241.82 cw(c-257.33,161.48) -200.53,218.29 ccw(c-257.33,161.48) -257.33,241.82 ; -257.33,241.82 ccw(c-257.33,322.15) -200.53,265.35 cw(c-257.33,322.15) -257.33,241.82
  BottomLayer w24: P2.5@-373.85,241.82 P2.5@-177,241.82 ; P2.5@-350.32,218.29 cw(c-293.52,161.48) -293.52,241.82 cw(c-293.52,322.15) P2.5@-350.32,265.35 ; P2.5@-200.53,218.29 ccw(c-257.33,161.48) -257.33,241.82 ccw(c-257.33,322.15) P2.5@-200.53,265.35
T-: F2.1 P2.4 | length 1790.2
  TopLayer w24: F2.1@-645.96,299.27 F2.1@-646.96,300.27 ; F2.1@-642.45,304.79 F2.1@-646.96,300.27 ; P2.4@-177,379.61 -457.39,379.61 -536.73,300.27 F2.1@-646.96,300.27 ; -623.65,300.27 cw(c-623.65,323.58) -640.13,307.1 ccw(c-623.65,323.58) -623.65,300.27 ; -623.65,300.27 ccw(c-623.65,276.97) -640.13,293.45 cw(c-623.65,276.97) -623.65,300.27 ; -454.18,379.61 cw(c-454.18,299.28) -397.38,356.08 ccw(c-454.18,299.28) -454.18,379.61 ; -454.18,379.61 ccw(c-454.18,459.95) -397.38,403.14 cw(c-454.18,459.95) -454.18,379.61 ; -293.52,379.61 cw(c-293.52,459.95) -350.32,403.14 ccw(c-293.52,459.95) -293.52,379.61 ; -293.52,379.61 ccw(c-293.52,299.28) -350.32,356.08 cw(c-293.52,299.28) -293.52,379.61 ; -257.33,379.61 cw(c-257.33,299.28) -200.53,356.08 ccw(c-257.33,299.28) -257.33,379.61 ; -257.33,379.61 ccw(c-257.33,459.95) -200.53,403.14 cw(c-257.33,459.95) -257.33,379.61
  BottomLayer w24: P2.4@-373.85,379.61 P2.4@-177,379.61 ; P2.4@-350.32,356.08 cw(c-293.52,299.28) -293.52,379.61 cw(c-293.52,459.95) P2.4@-350.32,403.14 ; P2.4@-200.53,356.08 ccw(c-257.33,299.28) -257.33,379.61 ccw(c-257.33,459.95) P2.4@-200.53,403.14
pads on no net: U1.2 U1.5 U1.6 U1.10 U1.11 U1.20 U1.21 U1.22 U1.25 U1.26 U1.27 U1.28 U1.29 U1.30 U1.31 U1.32 U1.33 U1.38 U1.39 U1.40 U1.41 U1.42 U1.43 U1.45 U1.46 U8.14 U11.7 U11.10

## Polygon pours and split planes (outlines as drawn)
GNDX on GND "VCC-No Net" (solid, remove dead copper): -493,0 -494,1023.62 -1338,1023.62 -1338,773 -1285.96,740 -1286,540 -1783,531.87 -1783,0 -491,0
AGND on GND "VCC-No Net" (solid, remove dead copper): -2262,0 -2263,1023.62 -1496,1023.62 -1496,640 -1835,640 -1835,272 -1912,272 -1912,0 -2262,0
GNDX on VCC "VCC-No Net" (solid, remove dead copper): -493,0 -494,1023.62 -1338,1023.62 -1338,773 -1285.96,740 -1286,540 -1783,531.87 -1783,0 -491,0
AGND on VCC "VCC-No Net" (solid, remove dead copper): -2262,0 -2263,1023.62 -1496,1023.62 -1496,640 -1835,640 -1835,272 -1912,272 -1912,0 -2262,0
GNDX on BottomLayer "VCC-No Net" (solid, remove dead copper): -493,1 -494,1024.62 -1338,1024.62 -1338,774 -1285.96,741 -1286,541 -1783,532.87 -1783,1 -491,1
AGND on BottomLayer "VCC-No Net" (solid, remove dead copper): -2262,0 -2263,1023.62 -1496,1023.62 -1496,640 -1835,640 -1835,272 -1912,272 -1912,0 -2262,0

## Keep-outs
KeepOutLayer:
  lines w12: -2755.91,0 0,0 0,1023.62 -2755.91,1023.62 -2755.91,0

## Other copper
TopLayer:
  rectangle net GNDX: -1788.96,222.87 -1719.96,243.87
  rectangle net GNDX: -1633.96,327.87 -1598.96,361.87
  rectangle net GNDX: -1671.96,265.87 -1629.96,348.87
  rectangle net GNDX: -1722.96,222.87 -1575.96,272.87
  rectangle net DVDD: -1648.96,370.87 -1571.96,392.87
  rectangle net DVDD: -1792.96,359.87 -1643.96,423.87
GND:
  rectangle net ISO+3V3: -2115,90 -2073,477
  rectangle net ISO+3V3: -2089.95,289 -1828,346
  rectangle net ISO+3V3: -1876,289 -1828,620
VCC:
  rectangle net DVDD: -1855,140 -1505,184
  rectangle net DVDD: -1721,140 -1684,367
  rectangle net DVDD: -1721,330 -1370,367
  rectangle net ISO+3V3: -1855,588 -1811,873
  rectangle net ISO+3V3: -1906,588 -1811,622
BottomLayer:
  rectangle net ISO+3V3: -1856,596 -1631.21,659.5
  rectangle net ISO+3V6: -1555,902 -1507,983
  rectangle net ISO+3V6: -1698,935 -1507,983
  rectangle net ISO+3V3: -1798,759 -1673,787
  rectangle net ISO+3V3: -1651,587 -1590,727
  rectangle net ISO+3V3: -1906,587 -1590,622
  pour cut-out: -869.96,341.87 -779.96,341.87 -749.56,372.27 -596.56,372.27 -595.96,372.87 -595.96,278.87 -755.96,278.87 -781.96,252.87 -869.96,252.87

## Silkscreen, mask and mechanical layers (free items; w line width, h text height)
TopOverlay:
  text "CubeIO-RTD" at -2716,961 h40
  text "V1.0" at -2715,905 h30
  text "A0" at -2494.95,817.03 h40 r270
  text "A0" at -2243,806 h40 r270
  text "V+" at -514,763.1 h40 r90
  text "V+" at -253.35,761.1 h40 r90
  text "B0" at -2494.95,684.03 h40 r270
  text "B0" at -2243,682 h40 r270
  text "G" at -514,642.1 h40 r90
  text "G" at -253.35,640.1 h40 r90
  text "C0/1" at -2494.95,578.03 h40 r270
  text "C0/1" at -2243,575 h40 r270
  text "SDI" at -514,473.1 h40 r90
  text "SDI" at -253.35,471.1 h40 r90
  text "B1" at -2494.95,399.03 h40 r270
  text "B1" at -2243,399 h40 r270
  text "T-" at -514,351.1 h40 r90
  text "T-" at -253.35,349.1 h40 r90
  text "A1" at -2494.95,265.03 h40 r270
  text "A1" at -2243,262 h40 r270
  text "T+" at -514,215.1 h40 r90
  text "T+" at -253.35,213.1 h40 r90

## Text inside footprints (layer, text, board x,y; h text height)
C10: TopOverlay "+" at -871.78,505.22 h59.06 r90
D1: TopOverlay "+" at -778.96,758.27 h40 r270
Z1: BottomOverlay "+" at -805.96,433.27 h40 r90